# Altium PCB cm4gateway.PcbDoc (part 2 of 5)
Units mil, origin at the board's own origin, x right, y up, seen from the top; angles counter-clockwise.
Board outline 6299.21 x 4960.63 mil, 8 copper layers (Signal 1, Ground Plane 1, Signal 2, Power Plane 1, Power Plane 2, Signal 3, Ground Plane 2, Signal 4), stack 60.024 mil thick; 403 components, 273 nets, 1526 pads, 1156 vias.
Unrouted connection lines stored in the file: 5.
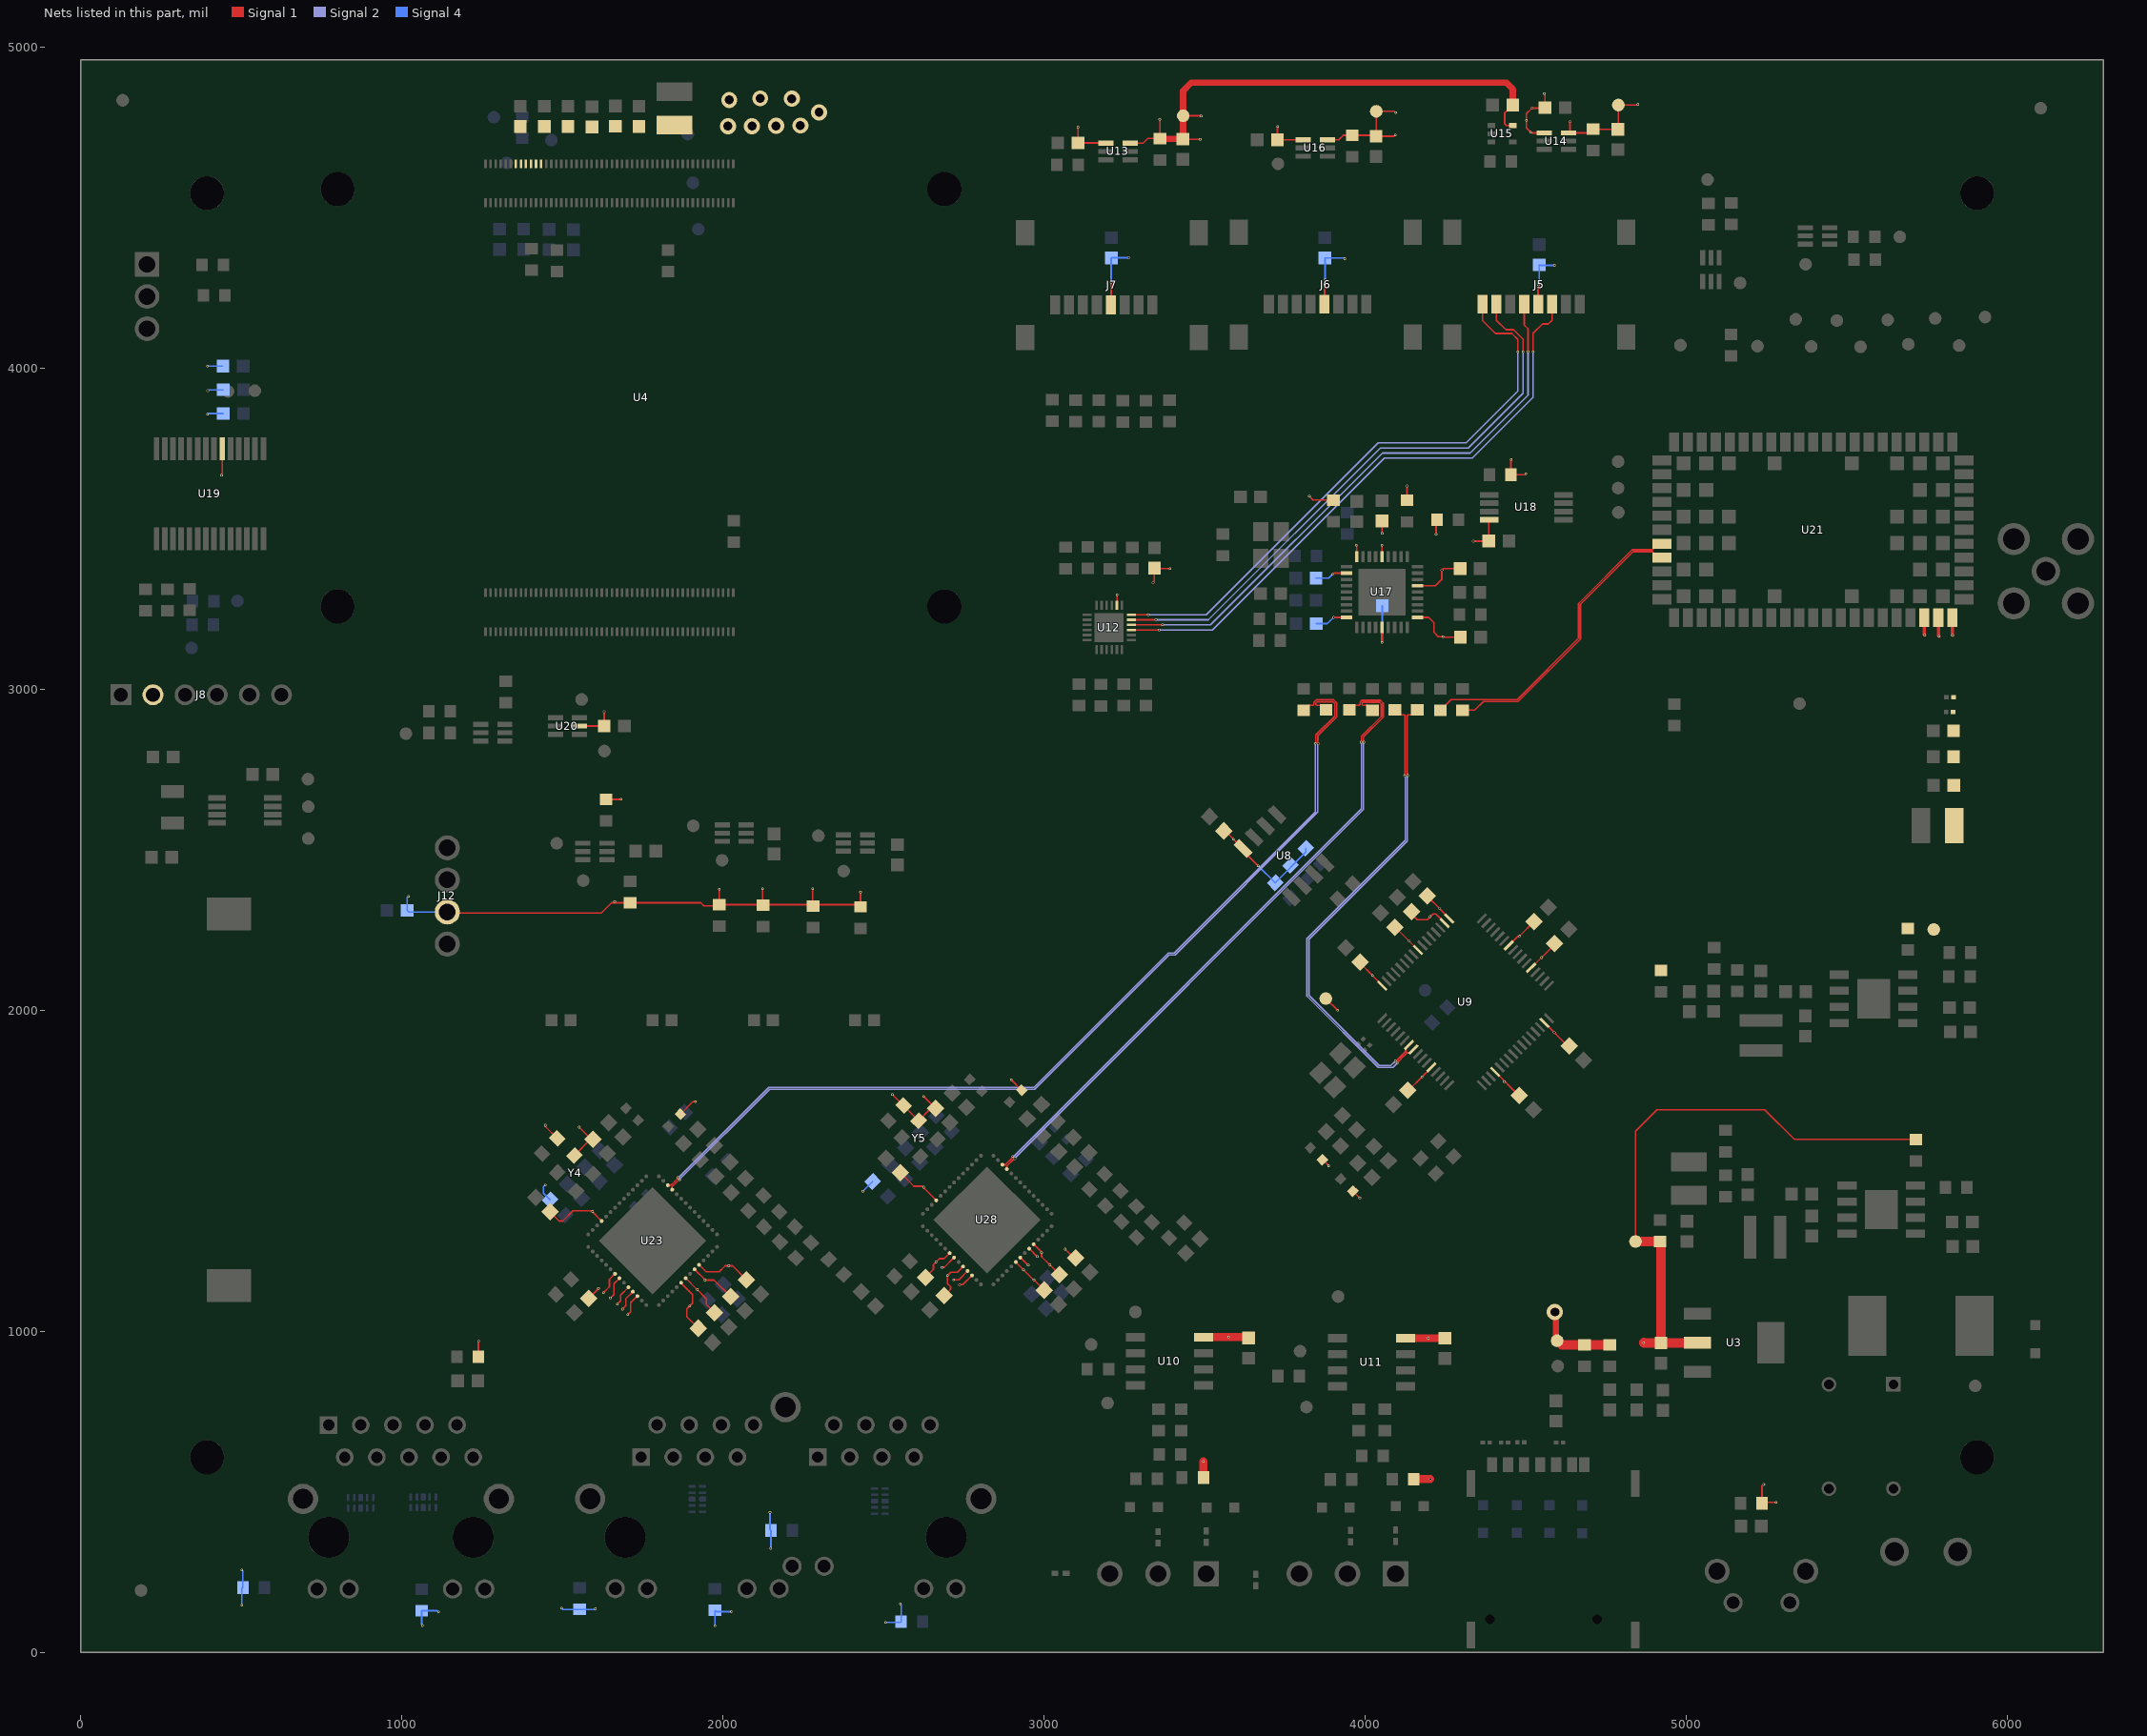
[diagram p8: the nets of this part, all layers, seen from the top]

## Footprints (in the part's own frame and the unit in brackets; to place one, negate y for a bottom-side part, rotate by r counter-clockwise, add the part's x,y. Pads: shape width x height; smd on the part's side, far side on the other; paste and mask are expansions set on the pad) (continued)
QFN50P800X800X100-57N-D [mm]
  round 0.3 smd: 1(-3.95,3.25) 2(-3.95,2.75) 3(-3.95,2.25) 4(-3.95,1.75) 5(-3.95,1.25) 6(-3.95,0.75) 7(-3.95,0.25) 8(-3.95,-0.25) 9(-3.95,-0.75) 10(-3.95,-1.25) 11(-3.95,-1.75) 12(-3.95,-2.25) 13(-3.95,-2.75) 14(-3.95,-3.25) 15(-3.25,-3.95) 16(-2.75,-3.95) 17(-2.25,-3.95) 18(-1.75,-3.95) 19(-1.25,-3.95) 20(-0.75,-3.95) 21(-0.25,-3.95) 22(0.25,-3.95) 23(0.75,-3.95) 24(1.25,-3.95) 25(1.75,-3.95) 26(2.25,-3.95) 27(2.75,-3.95) 28(3.25,-3.95) 29(3.95,-3.25) 30(3.95,-2.75) 31(3.95,-2.25) 32(3.95,-1.75) 33(3.95,-1.25) 34(3.95,-0.75) 35(3.95,-0.25) 36(3.95,0.25) 37(3.95,0.75) 38(3.95,1.25) 39(3.95,1.75) 40(3.95,2.25) 41(3.95,2.75) 42(3.95,3.25) 43(3.25,3.95) 44(2.75,3.95) 45(2.25,3.95) 46(1.75,3.95) 47(1.25,3.95) 48(0.75,3.95) 49(0.25,3.95) 50(-0.25,3.95) 51(-0.75,3.95) 52(-1.25,3.95) 53(-1.75,3.95) 54(-2.25,3.95) 55(-2.75,3.95) 56(-3.25,3.95)
  rrect0% 6x6 smd: 57(0,0)
  Signal 1 region: 4.4,0.1 3.65,0.099 3.611,0.104 3.574,0.119 3.543,0.143 3.519,0.174 3.504,0.211 3.499,0.25 3.504,0.289 3.519,0.326 3.543,0.357 3.574,0.381 3.611,0.396 3.65,0.401 3.65,0.4 4.4,0.4 4.4,0.1
  Signal 1 region: 4.4,-0.4 3.65,-0.401 3.611,-0.396 3.574,-0.381 3.543,-0.357 3.519,-0.326 3.504,-0.289 3.499,-0.25 3.504,-0.211 3.519,-0.174 3.543,-0.143 3.574,-0.119 3.611,-0.104 3.65,-0.099 3.65,-0.1 4.4,-0.1 4.4,-0.4
  Signal 1 region: 4.4,-2.9 3.65,-2.901 3.611,-2.896 3.574,-2.881 3.543,-2.857 3.519,-2.826 3.504,-2.789 3.499,-2.75 3.504,-2.711 3.519,-2.674 3.543,-2.643 3.574,-2.619 3.611,-2.604 3.65,-2.599 3.65,-2.6 4.4,-2.6 4.4,-2.9
  Signal 1 region: 4.4,-3.4 3.65,-3.401 3.611,-3.396 3.574,-3.381 3.543,-3.357 3.519,-3.326 3.504,-3.289 3.499,-3.25 3.504,-3.211 3.519,-3.174 3.543,-3.143 3.574,-3.119 3.611,-3.104 3.65,-3.099 3.65,-3.1 4.4,-3.1 4.4,-3.4
  Signal 1 region: 4.4,2.1 3.65,2.099 3.611,2.104 3.574,2.119 3.543,2.143 3.519,2.174 3.504,2.211 3.499,2.25 3.504,2.289 3.519,2.326 3.543,2.357 3.574,2.381 3.611,2.396 3.65,2.401 3.65,2.4 4.4,2.4 4.4,2.1
  Signal 1 region: 4.4,1.6 3.65,1.599 3.611,1.604 3.574,1.619 3.543,1.643 3.519,1.674 3.504,1.711 3.499,1.75 3.504,1.789 3.519,1.826 3.543,1.857 3.574,1.881 3.611,1.896 3.65,1.901 3.65,1.9 4.4,1.9 4.4,1.6
  Signal 1 region: 4.4,3.1 3.65,3.099 3.611,3.104 3.574,3.119 3.543,3.143 3.519,3.174 3.504,3.211 3.499,3.25 3.504,3.289 3.519,3.326 3.543,3.357 3.574,3.381 3.611,3.396 3.65,3.401 3.65,3.4 4.4,3.4 4.4,3.1
  Signal 1 region: 4.4,2.6 3.65,2.599 3.611,2.604 3.574,2.619 3.543,2.643 3.519,2.674 3.504,2.711 3.499,2.75 3.504,2.789 3.519,2.826 3.543,2.857 3.574,2.881 3.611,2.896 3.65,2.901 3.65,2.9 4.4,2.9 4.4,2.6
  Signal 1 region: 4.4,1.1 3.65,1.099 3.611,1.104 3.574,1.119 3.543,1.143 3.519,1.174 3.504,1.211 3.499,1.25 3.504,1.289 3.519,1.326 3.543,1.357 3.574,1.381 3.611,1.396 3.65,1.401 3.65,1.4 4.4,1.4 4.4,1.1
  Signal 1 region: 4.4,0.6 3.65,0.599 3.611,0.604 3.574,0.619 3.543,0.643 3.519,0.674 3.504,0.711 3.499,0.75 3.504,0.789 3.519,0.826 3.543,0.857 3.574,0.881 3.611,0.896 3.65,0.901 3.65,0.9 4.4,0.9 4.4,0.6
  Signal 1 region: 3.1,-4.4 3.099,-3.65 3.104,-3.611 3.119,-3.574 3.143,-3.543 3.174,-3.519 3.211,-3.504 3.25,-3.499 3.289,-3.504 3.326,-3.519 3.357,-3.543 3.381,-3.574 3.396,-3.611 3.401,-3.65 3.4,-3.65 3.4,-4.4 3.1,-4.4
  Signal 1 region: 2.6,-4.4 2.599,-3.65 2.604,-3.611 2.619,-3.574 2.643,-3.543 2.674,-3.519 2.711,-3.504 2.75,-3.499 2.789,-3.504 2.826,-3.519 2.857,-3.543 2.881,-3.574 2.896,-3.611 2.901,-3.65 2.9,-3.65 2.9,-4.4 2.6,-4.4
  Signal 1 region: 2.1,-4.4 2.099,-3.65 2.104,-3.611 2.119,-3.574 2.143,-3.543 2.174,-3.519 2.211,-3.504 2.25,-3.499 2.289,-3.504 2.326,-3.519 2.357,-3.543 2.381,-3.574 2.396,-3.611 2.401,-3.65 2.4,-3.65 2.4,-4.4 2.1,-4.4
  Signal 1 region: 1.6,-4.4 1.599,-3.65 1.604,-3.611 1.619,-3.574 1.643,-3.543 1.674,-3.519 1.711,-3.504 1.75,-3.499 1.789,-3.504 1.826,-3.519 1.857,-3.543 1.881,-3.574 1.896,-3.611 1.901,-3.65 1.9,-3.65 1.9,-4.4 1.6,-4.4
  Signal 1 region: 1.1,-4.4 1.099,-3.65 1.104,-3.611 1.119,-3.574 1.143,-3.543 1.174,-3.519 1.211,-3.504 1.25,-3.499 1.289,-3.504 1.326,-3.519 1.357,-3.543 1.381,-3.574 1.396,-3.611 1.401,-3.65 1.4,-3.65 1.4,-4.4 1.1,-4.4
  Signal 1 region: 0.6,-4.4 0.599,-3.65 0.604,-3.611 0.619,-3.574 0.643,-3.543 0.674,-3.519 0.711,-3.504 0.75,-3.499 0.789,-3.504 0.826,-3.519 0.857,-3.543 0.881,-3.574 0.896,-3.611 0.901,-3.65 0.9,-3.65 0.9,-4.4 0.6,-4.4
  Signal 1 region: 0.1,-4.4 0.099,-3.65 0.104,-3.611 0.119,-3.574 0.143,-3.543 0.174,-3.519 0.211,-3.504 0.25,-3.499 0.289,-3.504 0.326,-3.519 0.357,-3.543 0.381,-3.574 0.396,-3.611 0.401,-3.65 0.4,-3.65 0.4,-4.4 0.1,-4.4
  Signal 1 region: -0.4,-4.4 -0.401,-3.65 -0.396,-3.611 -0.381,-3.574 -0.357,-3.543 -0.326,-3.519 -0.289,-3.504 -0.25,-3.499 -0.211,-3.504 -0.174,-3.519 -0.143,-3.543 -0.119,-3.574 -0.104,-3.611 -0.099,-3.65 -0.1,-3.65 -0.1,-4.4 -0.4,-4.4
  Signal 1 region: -0.9,-4.4 -0.901,-3.65 -0.896,-3.611 -0.881,-3.574 -0.857,-3.543 -0.826,-3.519 -0.789,-3.504 -0.75,-3.499 -0.711,-3.504 -0.674,-3.519 -0.643,-3.543 -0.619,-3.574 -0.604,-3.611 -0.599,-3.65 -0.6,-3.65 -0.6,-4.4 -0.9,-4.4
  Signal 1 region: -1.4,-4.4 -1.401,-3.65 -1.396,-3.611 -1.381,-3.574 -1.357,-3.543 -1.326,-3.519 -1.289,-3.504 -1.25,-3.499 -1.211,-3.504 -1.174,-3.519 -1.143,-3.543 -1.119,-3.574 -1.104,-3.611 -1.099,-3.65 -1.1,-3.65 -1.1,-4.4 -1.4,-4.4
  Signal 1 region: -1.9,-4.4 -1.901,-3.65 -1.896,-3.611 -1.881,-3.574 -1.857,-3.543 -1.826,-3.519 -1.789,-3.504 -1.75,-3.499 -1.711,-3.504 -1.674,-3.519 -1.643,-3.543 -1.619,-3.574 -1.604,-3.611 -1.599,-3.65 -1.6,-3.65 -1.6,-4.4 -1.9,-4.4
  Signal 1 region: -2.4,-4.4 -2.401,-3.65 -2.396,-3.611 -2.381,-3.574 -2.357,-3.543 -2.326,-3.519 -2.289,-3.504 -2.25,-3.499 -2.211,-3.504 -2.174,-3.519 -2.143,-3.543 -2.119,-3.574 -2.104,-3.611 -2.099,-3.65 -2.1,-3.65 -2.1,-4.4 -2.4,-4.4
  Signal 1 region: -2.9,-4.4 -2.901,-3.65 -2.896,-3.611 -2.881,-3.574 -2.857,-3.543 -2.826,-3.519 -2.789,-3.504 -2.75,-3.499 -2.711,-3.504 -2.674,-3.519 -2.643,-3.543 -2.619,-3.574 -2.604,-3.611 -2.599,-3.65 -2.6,-3.65 -2.6,-4.4 -2.9,-4.4
  Signal 1 region: -3.4,-4.4 -3.401,-3.65 -3.396,-3.611 -3.381,-3.574 -3.357,-3.543 -3.326,-3.519 -3.289,-3.504 -3.25,-3.499 -3.211,-3.504 -3.174,-3.519 -3.143,-3.543 -3.119,-3.574 -3.104,-3.611 -3.099,-3.65 -3.1,-3.65 -3.1,-4.4 -3.4,-4.4
  Signal 1 region: 3.4,4.4 3.401,3.65 3.396,3.611 3.381,3.574 3.357,3.543 3.326,3.519 3.289,3.504 3.25,3.499 3.211,3.504 3.174,3.519 3.143,3.543 3.119,3.574 3.104,3.611 3.099,3.65 3.1,3.65 3.1,4.4 3.4,4.4
  Signal 1 region: 2.9,4.4 2.901,3.65 2.896,3.611 2.881,3.574 2.857,3.543 2.826,3.519 2.789,3.504 2.75,3.499 2.711,3.504 2.674,3.519 2.643,3.543 2.619,3.574 2.604,3.611 2.599,3.65 2.6,3.65 2.6,4.4 2.9,4.4
  Signal 1 region: 2.4,4.4 2.401,3.65 2.396,3.611 2.381,3.574 2.357,3.543 2.326,3.519 2.289,3.504 2.25,3.499 2.211,3.504 2.174,3.519 2.143,3.543 2.119,3.574 2.104,3.611 2.099,3.65 2.1,3.65 2.1,4.4 2.4,4.4
  Signal 1 region: 1.9,4.4 1.901,3.65 1.896,3.611 1.881,3.574 1.857,3.543 1.826,3.519 1.789,3.504 1.75,3.499 1.711,3.504 1.674,3.519 1.643,3.543 1.619,3.574 1.604,3.611 1.599,3.65 1.6,3.65 1.6,4.4 1.9,4.4
  Signal 1 region: 1.4,4.4 1.401,3.65 1.396,3.611 1.381,3.574 1.357,3.543 1.326,3.519 1.289,3.504 1.25,3.499 1.211,3.504 1.174,3.519 1.143,3.543 1.119,3.574 1.104,3.611 1.099,3.65 1.1,3.65 1.1,4.4 1.4,4.4
  Signal 1 region: 0.9,4.4 0.901,3.65 0.896,3.611 0.881,3.574 0.857,3.543 0.826,3.519 0.789,3.504 0.75,3.499 0.711,3.504 0.674,3.519 0.643,3.543 0.619,3.574 0.604,3.611 0.599,3.65 0.6,3.65 0.6,4.4 0.9,4.4
  Signal 1 region: 0.4,4.4 0.401,3.65 0.396,3.611 0.381,3.574 0.357,3.543 0.326,3.519 0.289,3.504 0.25,3.499 0.211,3.504 0.174,3.519 0.143,3.543 0.119,3.574 0.104,3.611 0.099,3.65 0.1,3.65 0.1,4.4 0.4,4.4
  Signal 1 region: -0.1,4.4 -0.099,3.65 -0.104,3.611 -0.119,3.574 -0.143,3.543 -0.174,3.519 -0.211,3.504 -0.25,3.499 -0.289,3.504 -0.326,3.519 -0.357,3.543 -0.381,3.574 -0.396,3.611 -0.401,3.65 -0.4,3.65 -0.4,4.4 -0.1,4.4
  Signal 1 region: -0.6,4.4 -0.599,3.65 -0.604,3.611 -0.619,3.574 -0.643,3.543 -0.674,3.519 -0.711,3.504 -0.75,3.499 -0.789,3.504 -0.826,3.519 -0.857,3.543 -0.881,3.574 -0.896,3.611 -0.901,3.65 -0.9,3.65 -0.9,4.4 -0.6,4.4
  Signal 1 region: -1.1,4.4 -1.099,3.65 -1.104,3.611 -1.119,3.574 -1.143,3.543 -1.174,3.519 -1.211,3.504 -1.25,3.499 -1.289,3.504 -1.326,3.519 -1.357,3.543 -1.381,3.574 -1.396,3.611 -1.401,3.65 -1.4,3.65 -1.4,4.4 -1.1,4.4
  Signal 1 region: -1.6,4.4 -1.599,3.65 -1.604,3.611 -1.619,3.574 -1.643,3.543 -1.674,3.519 -1.711,3.504 -1.75,3.499 -1.789,3.504 -1.826,3.519 -1.857,3.543 -1.881,3.574 -1.896,3.611 -1.901,3.65 -1.9,3.65 -1.9,4.4 -1.6,4.4
  Signal 1 region: -2.1,4.4 -2.099,3.65 -2.104,3.611 -2.119,3.574 -2.143,3.543 -2.174,3.519 -2.211,3.504 -2.25,3.499 -2.289,3.504 -2.326,3.519 -2.357,3.543 -2.381,3.574 -2.396,3.611 -2.401,3.65 -2.4,3.65 -2.4,4.4 -2.1,4.4
  Signal 1 region: -2.6,4.4 -2.599,3.65 -2.604,3.611 -2.619,3.574 -2.643,3.543 -2.674,3.519 -2.711,3.504 -2.75,3.499 -2.789,3.504 -2.826,3.519 -2.857,3.543 -2.881,3.574 -2.896,3.611 -2.901,3.65 -2.9,3.65 -2.9,4.4 -2.6,4.4
  Signal 1 region: -3.1,4.4 -3.099,3.65 -3.104,3.611 -3.119,3.574 -3.143,3.543 -3.174,3.519 -3.211,3.504 -3.25,3.499 -3.289,3.504 -3.326,3.519 -3.357,3.543 -3.381,3.574 -3.396,3.611 -3.401,3.65 -3.4,3.65 -3.4,4.4 -3.1,4.4
  Signal 1 region: -4.4,-0.6 -3.65,-0.599 -3.611,-0.604 -3.574,-0.619 -3.543,-0.643 -3.519,-0.674 -3.504,-0.711 -3.499,-0.75 -3.504,-0.789 -3.519,-0.826 -3.543,-0.857 -3.574,-0.881 -3.611,-0.896 -3.65,-0.901 -3.65,-0.9 -4.4,-0.9 -4.4,-0.6
  Signal 1 region: -4.4,-1.1 -3.65,-1.099 -3.611,-1.104 -3.574,-1.119 -3.543,-1.143 -3.519,-1.174 -3.504,-1.211 -3.499,-1.25 -3.504,-1.289 -3.519,-1.326 -3.543,-1.357 -3.574,-1.381 -3.611,-1.396 -3.65,-1.401 -3.65,-1.4 -4.4,-1.4 -4.4,-1.1
  Signal 1 region: -4.4,-0.1 -3.65,-0.099 -3.611,-0.104 -3.574,-0.119 -3.543,-0.143 -3.519,-0.174 -3.504,-0.211 -3.499,-0.25 -3.504,-0.289 -3.519,-0.326 -3.543,-0.357 -3.574,-0.381 -3.611,-0.396 -3.65,-0.401 -3.65,-0.4 -4.4,-0.4 -4.4,-0.1
  Signal 1 region: -4.4,-2.6 -3.65,-2.599 -3.611,-2.604 -3.574,-2.619 -3.543,-2.643 -3.519,-2.674 -3.504,-2.711 -3.499,-2.75 -3.504,-2.789 -3.519,-2.826 -3.543,-2.857 -3.574,-2.881 -3.611,-2.896 -3.65,-2.901 -3.65,-2.9 -4.4,-2.9 -4.4,-2.6
  Signal 1 region: -4.4,-3.1 -3.65,-3.099 -3.611,-3.104 -3.574,-3.119 -3.543,-3.143 -3.519,-3.174 -3.504,-3.211 -3.499,-3.25 -3.504,-3.289 -3.519,-3.326 -3.543,-3.357 -3.574,-3.381 -3.611,-3.396 -3.65,-3.401 -3.65,-3.4 -4.4,-3.4 -4.4,-3.1
  Signal 1 region: -4.4,-1.6 -3.65,-1.599 -3.611,-1.604 -3.574,-1.619 -3.543,-1.643 -3.519,-1.674 -3.504,-1.711 -3.499,-1.75 -3.504,-1.789 -3.519,-1.826 -3.543,-1.857 -3.574,-1.881 -3.611,-1.896 -3.65,-1.901 -3.65,-1.9 -4.4,-1.9 -4.4,-1.6
  Signal 1 region: -4.4,-2.1 -3.65,-2.099 -3.611,-2.104 -3.574,-2.119 -3.543,-2.143 -3.519,-2.174 -3.504,-2.211 -3.499,-2.25 -3.504,-2.289 -3.519,-2.326 -3.543,-2.357 -3.574,-2.381 -3.611,-2.396 -3.65,-2.401 -3.65,-2.4 -4.4,-2.4 -4.4,-2.1
  Signal 1 region: -4.4,2.4 -3.65,2.401 -3.611,2.396 -3.574,2.381 -3.543,2.357 -3.519,2.326 -3.504,2.289 -3.499,2.25 -3.504,2.211 -3.519,2.174 -3.543,2.143 -3.574,2.119 -3.611,2.104 -3.65,2.099 -3.65,2.1 -4.4,2.1 -4.4,2.4
  Signal 1 region: -4.4,2.9 -3.65,2.901 -3.611,2.896 -3.574,2.881 -3.543,2.857 -3.519,2.826 -3.504,2.789 -3.499,2.75 -3.504,2.711 -3.519,2.674 -3.543,2.643 -3.574,2.619 -3.611,2.604 -3.65,2.599 -3.65,2.6 -4.4,2.6 -4.4,2.9
  Signal 1 region: -4.4,3.4 -3.65,3.401 -3.611,3.396 -3.574,3.381 -3.543,3.357 -3.519,3.326 -3.504,3.289 -3.499,3.25 -3.504,3.211 -3.519,3.174 -3.543,3.143 -3.574,3.119 -3.611,3.104 -3.65,3.099 -3.65,3.1 -4.4,3.1 -4.4,3.4
  Signal 1 region: -4.4,0.4 -3.65,0.401 -3.611,0.396 -3.574,0.381 -3.543,0.357 -3.519,0.326 -3.504,0.289 -3.499,0.25 -3.504,0.211 -3.519,0.174 -3.543,0.143 -3.574,0.119 -3.611,0.104 -3.65,0.099 -3.65,0.1 -4.4,0.1 -4.4,0.4
  Signal 1 region: -4.4,0.9 -3.65,0.901 -3.611,0.896 -3.574,0.881 -3.543,0.857 -3.519,0.826 -3.504,0.789 -3.499,0.75 -3.504,0.711 -3.519,0.674 -3.543,0.643 -3.574,0.619 -3.611,0.604 -3.65,0.599 -3.65,0.6 -4.4,0.6 -4.4,0.9
  Signal 1 region: -4.4,1.4 -3.65,1.401 -3.611,1.396 -3.574,1.381 -3.543,1.357 -3.519,1.326 -3.504,1.289 -3.499,1.25 -3.504,1.211 -3.519,1.174 -3.543,1.143 -3.574,1.119 -3.611,1.104 -3.65,1.099 -3.65,1.1 -4.4,1.1 -4.4,1.4
  Signal 1 region: -4.4,1.9 -3.65,1.901 -3.611,1.896 -3.574,1.881 -3.543,1.857 -3.519,1.826 -3.504,1.789 -3.499,1.75 -3.504,1.711 -3.519,1.674 -3.543,1.643 -3.574,1.619 -3.611,1.604 -3.65,1.599 -3.65,1.6 -4.4,1.6 -4.4,1.9
  Signal 1 region: 4.4,-2.4 3.65,-2.401 3.611,-2.396 3.574,-2.381 3.543,-2.357 3.519,-2.326 3.504,-2.289 3.499,-2.25 3.504,-2.211 3.519,-2.174 3.543,-2.143 3.574,-2.119 3.611,-2.104 3.65,-2.099 3.65,-2.1 4.4,-2.1 4.4,-2.4
  Signal 1 region: 4.4,-1.9 3.65,-1.901 3.611,-1.896 3.574,-1.881 3.543,-1.857 3.519,-1.826 3.504,-1.789 3.499,-1.75 3.504,-1.711 3.519,-1.674 3.543,-1.643 3.574,-1.619 3.611,-1.604 3.65,-1.599 3.65,-1.6 4.4,-1.6 4.4,-1.9
  Signal 1 region: 4.4,-0.9 3.65,-0.901 3.611,-0.896 3.574,-0.881 3.543,-0.857 3.519,-0.826 3.504,-0.789 3.499,-0.75 3.504,-0.711 3.519,-0.674 3.543,-0.643 3.574,-0.619 3.611,-0.604 3.65,-0.599 3.65,-0.6 4.4,-0.6 4.4,-0.9
  Signal 1 region: 4.4,-1.4 3.65,-1.401 3.611,-1.396 3.574,-1.381 3.543,-1.357 3.519,-1.326 3.504,-1.289 3.499,-1.25 3.504,-1.211 3.519,-1.174 3.543,-1.143 3.574,-1.119 3.611,-1.104 3.65,-1.099 3.65,-1.1 4.4,-1.1 4.4,-1.4
  silkscreen extent -4.52,3.88 -4.28,4.12, body extent -4.05,-4.05 4.05,4.05, height 1
RESC1608N [mm] "Chip Resistor, Body 1.6x0.8mm, IPC Medium Density"
  rect 0.9x1 smd: 1(-0.85,0) 2(0.85,0)
  body extent -0.99,-0.45 0.99,0.53, height 0.43
SC70-TPS22919DCKR6 [mm]
  rect 1.2x0.4 smd: 1(-0.95,0.65) 2(-0.95,0) 3(-0.95,-0.65) 4(0.95,-0.65) 5(0.95,0) 6(0.95,0.65)
  silkscreen extent -1.55,1.2 -0.35,1.2, body extent -1.02,-1 1.08,1, height 1.1
SMTU2032GTR [mm]
  rect 2.6x3.5 smd: 1(-14.7,0) 2(14.7,0)
  silkscreen extent -16.6,-10 16,10, body extent -15.9,-10.4 16.1,9.6, height 5.55
SOIC127P600X170-9N [mm]
  rect 1.525x0.65 smd: 1(-2.712,1.905) 2(-2.712,0.635) 3(-2.712,-0.635) 4(-2.712,-1.905) 5(2.712,-1.905) 6(2.712,-0.635) 7(2.712,0.635) 8(2.712,1.905)
  rect 2.6x3.1 smd: 9(0,0)
  silkscreen extent -3.47,2.58 -1.95,2.58, body extent -3.01,-2.45 3.01,2.45, height 1.57
SOIC127P600X175-8N-2 [mm]
  rect 1.5x0.65 smd: 1(-2.7,1.905) 2(-2.7,0.635) 3(-2.7,-0.635) 4(-2.7,-1.905) 5(2.7,-1.905) 6(2.7,-0.635) 7(2.7,0.635) 8(2.7,1.905)
  silkscreen extent -3.45,-2.45 1.6,2.58, body extent -2.91,-2.55 3.11,2.35, height 1.63
SOP65P490X110-8N [mm]
  rect 1.4x0.45 smd: 1(-2.2,0.975) 2(-2.2,0.325) 3(-2.2,-0.325) 4(-2.2,-0.975) 5(2.2,-0.975) 6(2.2,-0.325) 7(2.2,0.325) 8(2.2,0.975)
  silkscreen extent -2.9,-1.5 1.15,1.55, body extent -2.45,-1.5 2.45,1.5, height 1.1
SOP65P780X200-28N [mm]
  rect 1.8x0.45 smd: 1(-3.55,4.225) 2(-3.55,3.575) 3(-3.55,2.925) 4(-3.55,2.275) 5(-3.55,1.625) 6(-3.55,0.975) 7(-3.55,0.325) 8(-3.55,-0.325) 9(-3.55,-0.975) 10(-3.55,-1.625) 11(-3.55,-2.275) 12(-3.55,-2.925) 13(-3.55,-3.575) 14(-3.55,-4.225) 15(3.55,-4.225) 16(3.55,-3.575) 17(3.55,-2.925) 18(3.55,-2.275) 19(3.55,-1.625) 20(3.55,-0.975) 21(3.55,-0.325) 22(3.55,0.325) 23(3.55,0.975) 24(3.55,1.625) 25(3.55,2.275) 26(3.55,2.925) 27(3.55,3.575) 28(3.55,4.225)
  silkscreen extent -4.4,-5.1 2.3,5.1, body extent -3.9,-5.1 3.9,5.1, height 2
SOT65P210X110-6N [mm]
  rect 1.2x0.4 smd: 1(-0.95,0.65) 2(-0.95,0) 3(-0.95,-0.65) 4(0.95,-0.65) 5(0.95,0) 6(0.95,0.65)
  silkscreen extent -1.55,1.2 -0.35,1.2, body extent -0.9,-1.07 1.2,1.07, height 0.98
SOT65P210X1106N [mm]
  rect 1.2x0.4 smd: 1(-0.95,0.65) 2(-0.95,0) 3(-0.95,-0.65) 4(0.95,-0.65) 5(0.95,0) 6(0.95,0.65)
  silkscreen extent -1.55,1.2 -0.35,1.2, body extent -1.05,-1 1.05,1, height 1
SOT-223-4-2 [mm]
  rect 2.15x0.95 smd paste+0 mask+0.07: 1(-2.9,2.3) 2(-2.9,0) 3(-2.9,-2.3)
  rect 2.15x3.3 smd paste+0 mask+0.07: 4(2.9,0)
  silkscreen extent -1.4,-3.35 1.4,3.35, body extent -3.5,-3.25 3.5,3.25, height 1.8
SOT-353 [mm] "SOT23, 6-Leads, Body 2,90x2,80mm, Pitch 0,95mm, IPC Medium Density"
  rect 0.6x0.4 smd mask+0.07: 1(0,0) 2(0,-0.65) 3(0,-1.3) 4(1.7,-1.3) 5(1.7,0)
  silkscreen extent 0.56,-1.71 1.15,0.43, body extent -0.2,-1.71 1.9,0.44, height 1.02
SQFN-36 [mm]
  rect 0.9x0.28 smd: 1(-2.8,2) 2(-2.8,1.5) 3(-2.8,1) 4(-2.8,0.5) 5(-2.8,0) 6(-2.8,-0.5) 7(-2.8,-1) 8(-2.8,-1.5) 9(-2.8,-2) 19(2.8,-2) 20(2.8,-1.5) 21(2.8,-1) 22(2.8,-0.5) 23(2.8,0) 24(2.8,0.5) 25(2.8,1) 26(2.8,1.5) 27(2.8,2)
  rect 0.28x0.9 smd: 10(-2,-2.8) 11(-1.5,-2.8) 12(-1,-2.8) 13(-0.5,-2.8) 14(0,-2.8) 15(0.5,-2.8) 16(1,-2.8) 17(1.5,-2.8) 18(2,-2.8) 28(2,2.8) 29(1.5,2.8) 30(1,2.8) 31(0.5,2.8) 32(0,2.8) 33(-0.5,2.8) 34(-1,2.8) 35(-1.5,2.8) 36(-2,2.8)
  rrect0% 3.7x3.7 smd: 37(0,0)
  silkscreen extent -3.03,-3 3.01,3, body extent -3.05,-3.05 3.05,3.05, height 1
TP [mm]
  round 1 smd paste-2 mask+0.1: 1(0,0)
  silkscreen extent -0.75,-0.75 0.75,0.75
TQFN-24 [mm]
  rect 0.7x0.2 smd mask+0.07: 1(-1.753,1) 2(-1.753,0.6) 3(-1.753,0.2) 4(-1.753,-0.2) 5(-1.753,-0.6) 6(-1.753,-1) 13(1.753,-1) 14(1.753,-0.6) 15(1.753,-0.2) 16(1.753,0.2) 17(1.753,0.6) 18(1.753,1)
  rect 0.2x0.7 smd mask+0.07: 7(-1,-1.753) 8(-0.6,-1.753) 9(-0.2,-1.753) 10(0.2,-1.753) 11(0.6,-1.753) 12(1,-1.753) 19(1,1.753) 20(0.6,1.753) 21(0.2,1.753) 22(-0.2,1.753) 23(-0.6,1.753) 24(-1,1.753)
  rect 2.3x2.3 smd mask+0.07: 25(0,0)
  silkscreen extent -2.06,-2.05 2.1,2.1, body extent -1.5,-1.5 1.5,1.5, height 0.98
TSSOP-8AT24C04D-XHM-B [mm]
  rect 1.475x0.45 smd: 1(-2.938,0.975) 2(-2.938,0.325) 3(-2.938,-0.325) 4(-2.938,-0.975) 5(2.938,-0.975) 6(2.938,-0.325) 7(2.938,0.325) 8(2.938,0.975)
  silkscreen extent -3.67,-1.5 1.85,1.55, body extent -3.4,-1.5 3,1.5, height 1.2
USON-10 [mm]
  rrect50% 0.565x0.2 smd mask+0.07: 1(0,0) 2(0,-0.5) 4(0,-1.5) 5(0,-2) 6(0.835,-2) 7(0.835,-1.5) 9(0.835,-0.5) 10(0.835,0)
  rrect50% 0.565x0.4 smd mask+0.07: 3(0,-1) 8(0.835,-1)
  silkscreen extent -0.53,-2.5 1.29,0.5, body extent -0.08,-2.26 0.93,0.24, height 0.54
WE-RJ45-7499021125 [mm]
  rect 1.4x1.4 hole 0.89: A1(-11.43,6.5) B1(2.54,6.5)
  round 1.4 hole 0.89: A2(-10.16,9.04) A3(-8.89,6.5) A4(-7.62,9.04) A5(-6.35,6.5) A6(-5.08,9.04) A7(-3.81,6.5) A8(-2.54,9.04) B2(3.81,9.04) B3(5.08,6.5) B4(6.35,9.04) B5(7.62,6.5) B6(8.89,9.04) B7(10.16,6.5) B8(11.43,9.04)
  round 1.52 hole 1.02: A9(-13.47,-3.91) A10(-10.93,-3.91) A11(-3.05,-3.91) A12(-0.51,-3.91) B9(0.51,-2.14) B10(3.05,-2.14) B11(10.93,-3.91) B12(13.47,-3.91)
  round 3.25 hole 3.25 unplated: MH1(-12.7,0.15) MH2(12.7,0.15)
  round 2.4 hole 1.63: Shell(-15.465,3.2) Shell(0,10.44) Shell(15.465,3.2)
  silkscreen extent -16.86,-10.75 16.86,10.75, body extent -16.92,-10.75 16.92,10.75, height 14.81
WE-RJ45-7499111121A [mm]
  rect 1.4x1.4 hole 0.9: 1(-5.715,6.485)
  round 1.4 hole 0.9: 2(-4.445,3.945) 3(-3.175,6.485) 4(-1.905,3.945) 5(-0.635,6.485) 6(0.635,3.945) 7(1.905,6.485) 8(3.175,3.945) 9(4.445,6.485) 10(5.715,3.945)
  round 1.52 hole 1.02: 11(-6.63,-6.485) 12(-4.09,-6.485) 13(4.09,-6.485) 14(6.63,-6.485)
  round 3.25 hole 3.25 unplated: MH1(-5.715,-2.405) MH2(5.715,-2.405)
  round 2.4 hole 1.6: Shell(-7.745,0.645) Shell(7.745,0.645)
  silkscreen extent -9.83,-13.29 9.83,8.55, body extent -9.92,-13.29 9.92,8.55, height 16.01
XT1312HHRXX32K76E [mm]
  rect 1x1.8 smd: 1(-1.25,0) 2(1.25,0)
  body extent -1.6,-0.75 1.6,0.75, height 0.81

## Part data
C1 C4 C8 C11 C15 C17 C19 C20 C21 C23 C25 C31 C33 C36 C37 C38 C40 C43 C44 C45 C46 C47 C48 C49 C50 C51 C54 C55 C57 C58 C59 C60 C61 C62 C63 C64 C65 C66 C67 C68 C71 C72 C73 C80 C85 C92 C95 C96 C97 C98 C102 C107 C108 C109 C114 C116 C117 C118 C122 C127 C128 C129: library part CAP-000000017, Value 1="100 nF", Value 2=50V, DES="Ceramic Capacitor, 100 nF, 50V, X7R, 0603", FTP=603, MAN=Murata, MANREF=GRM188R71H104KA93D, Part Number=CAP-000000017, SUPREF=81-GRM188R71H104KA93D
C2 C9: library part CAP-000000027, Value 1="22 pF", Value 2=50V, DES="Ceramic Capacitor, 22 pF, 50V, C0G, 0603", FTP=603, MAN=Murata, MANREF=GRM1885C1H220JA01D, Part Number=CAP-000000027, SUPREF=81-GRM1885C1H220JA01D
C3: library part CAP-000000024, Value 1="22 µF", Value 2=25V, DES="Ceramic Capacitor, 22 µF, 25V, X5R, 0603", FTP=603, MAN=Murata, MANREF=GRM188R61E226ME15D, Part Number=CAP-000000024, SUPREF=81-GRM188R61E226ME15D
C5 C12 C27 C28 C29 C30 C52 C53 C56: library part CAP-000000025, Value 1="10 µF", Value 2=50V, DES="Ceramic Capacitor, 10 µF, 50V, X5R, 0603", FTP=603, MAN=Murata, MANREF=GRM188R61H106KAALD, Part Number=CAP-000000025, SUPREF=81-GRM188R61H106KAALD
C6 C13: library part CAP-000000026, Value 1="220 nF", Value 2=50V, DES="Ceramic Capacitor, 220 nF, 50V, X7R, 0603", FTP=603, MAN=Murata, MANREF=GRM188R71H224KA93D, Part Number=CAP-000000026, SUPREF=81-GRM188R71H224KA93D
C7 C14 C101 C121: library part CAP-000000018, Value 1="1 µF", Value 2=50V, DES="Ceramic Capacitor, 1 µF, 50V, X5R, 0603", FTP=603, MAN=Murata, MANREF=GRM188R61H105KAALD, Part Number=CAP-000000018, SUPREF=81-GRM188R61H105KAALD
C10 C79: library part CAP-000000029, Value 1="47 µF", Value 2=6.3V, DES="Tantalum Capacitor, 47 µF, 6.3V, 1210", FTP=1210, MAN=KEMET, MANREF=T491D476K006AT, Part Number=CAP-000000029, SUPREF=581-T491D476K006AT
C16: library part CAP-000000059, Part Number=CAP-000000002, Value 1="10 uF", Value 2="50 VDC", DES="Multilayer Ceramic Capacitors MLCC - SMD/SMT RECOMMENDED ALT 810-C3225X7R1H106250", FTP=0603, MAN="Murata Electronics", MANREF=GRM188R61E106MA73D, NOTE=_, SUP=Mouser, SUPREF=81-GRM188R61E106MA3D, TOL="20 %"
C18 C32: library part CAP-000000063, Part Number=CAP-000000006, Value 1="10 nF", Value 2="50 VDC", DES="Multilayer Ceramic Capacitors MLCC - SMD/SMT 50V 0.01uF 0603 X7R 5%", FTP=0603, MAN=KEMET, MANREF=C0603C103J5RACTU, NOTE=_, SUP=Mouser, SUPREF=80-C0603C103J5R, TOL="5 %"
C22 C24 C75: library part CAP-000000062, Part Number=CAP-000000005, Value 1="1 uF", Value 2="50 VDC", DES="Multilayer Ceramic Capacitors MLCC - SMD/SMT 10v 1uF X5R 0603 10%", FTP=0603, MAN=KEMET, MANREF=C0603C105K8PACTU, NOTE=_, SUP=Mouser, SUPREF=80-C0603C105K8P, TOL="10 %"
C26: library part CAP-000000068, Part Number=CAP-000000011, Value 1="330 µF", Value 2=6.3V, DES="Tantalum Capacitor, 330 µF, 6.3V, 1210", FTP=1210, MAN=KEMET, MANREF=T491D337K006AT, SUPREF=581-T491D337K006AT
C34 C35: library part CAP-000000021, Value 1="4.7 µF", Value 2=50V, DES="Ceramic Capacitor, 4.7 µF, 50V, X5R, 0603", FTP=603, MAN=Murata, MANREF=GRM188R61H475KE11D, Part Number=CAP-000000021, SUPREF=81-GRM188R61H475KE11D
C39 C74: library part CAP-000000065, Part Number=CAP-000000008, Value 1="3.3 uF", FTP=0603
C41 C42 C84: library part CAP-000000013, Value 1="8.2 pF", Value 2=50V, DES="Ceramic Capacitor, 8.2 pF, 50V, C0G, 0402", FTP=402, MAN=Murata, MANREF=GRM1555C1H8R2CA01D, Part Number=CAP-000000013, SUPREF=81-GRM1555C1H8R2CA01D
C69 C70: library part CAP-000000030, Value 1="18 pF", Value 2=50V, DES="Ceramic Capacitor, 18 pF, 50V, C0G, 0603", FTP=603, MAN=Murata, MANREF=GRM1885C1H180JA01D, Part Number=CAP-000000030, SUPREF=81-GRM1885C1H180JA01D
C76 C77 C78 C93 C115: library part CAP-000000060, Part Number=CAP-000000003, Value 1="0.1 uF", Value 2="50 VDC", DES="Multilayer Ceramic Capacitors MLCC - SMD/SMT 50V 0.1uF 0603 X7R 20%", FTP=0603, MAN=KEMET, MANREF=C0603C104M5RAC, NOTE=_, SUP=Mouser, SUPREF=80-C0603C104M5RAC, TOL="20 %"
C81: library part CAP-000000028, Value 1="10 nF", Value 2=50V, DES="Ceramic Capacitor, 10 nF, 50V, X7R, 0603", FTP=603, MAN=Murata, MANREF=GRM188R71H103KA01D, Part Number=CAP-000000028, SUPREF=81-GRM188R71H103KA01D
C82: library part CAP-000000070, Part Number=CAP-000000015, Value 1="56 pF", Value 2=50V, DES="Ceramic Capacitor, 56 pF, 50V, C0G, 0402", FTP=402, MAN="KYOCERA AVX", MANREF=KGM05ACG1H560KH, SUPREF=581-KGM05ACG1H560KH
C83: library part CAP-000000069, Part Number=CAP-000000014, Value 1="15 pF", Value 2=50V, DES="Ceramic Capacitor, 15 pF, 50V, C0G, 0603", FTP=603, MAN=Murata, MANREF=GRM1885C1H150JA01D, SUPREF=81-GRM1885C1H150JA01D
C86 C87 C88 C89: library part CAP-000000012, Value 1="47 pF", Value 2=50V, DES="Ceramic Capacitor, 47 pF, 50V, C0G, 0402", FTP=402, MAN=KEMET, MANREF=C0402C470J5GAC, Part Number=CAP-000000012, SUPREF=80-C0402C470J5GAC
C90: library part CAP-000000033, Value 1="10 pF", Value 2=50V, FTP=603, Part Number=CAP-000000033
C91: library part CAP-000000032, Value 1="12 pF", Value 2=50V, FTP=603, Part Number=CAP-000000032
C94 C113: library part CAP-000000023, Value 1="22 nF", Value 2=50V, DES="Ceramic Capacitor, 22 nF, 50V, X7R, 0603", FTP=603, MAN=Murata, MANREF=GRM188R71H223KA01D, Part Number=CAP-000000023, SUPREF=81-GRM188R71H223KA01D
C99 C103 C105 C106 C110 C111 C119 C123 C125 C126 C130 C131: library part CAP-000000019, Value 1="4.7 nF", Value 2=50V, DES="Ceramic Capacitor, 4.7 nF, 50V, X7R, 0603", FTP=603, MAN=Murata, MANREF=GRM188R71H472KA01D, Part Number=CAP-000000019, SUPREF=81-GRM188R71H472KA01D
C100 C104 C112 C120 C124 C132: library part CAP-000000020, Value 1="1.5 nF", Value 2=50V, DES="Ceramic Capacitor, 1.5 nF, 50V, X7R, 0603", FTP=603, MAN=Murata, MANREF=GRM188R71H152KA01D, Part Number=CAP-000000020, SUPREF=81-GRM188R71H152KA01D
D1 D3 D4 D5 D6 D11 D12 D13 D14: library part TVS-000000009, Part Number=TVS-000000003, Value 1="12 V", Value 2="11 A", DES="ESD Protection Diodes / TVS Diodes Bidirectional Ultra Low Cap", FTP=SOD-323-2, MAN=Bourns, MANREF=CDSOD323-T12LC, NOTE=_, SUP=Mouser, SUPREF=652-CDSOD323-T12LC, TOL=_
D7: library part LED-000000008, Part Number=LED-000000003, Value 1=0.02A, Value 2="3.2 V", DES="Standard LEDs - SMD WL-SMCW SMDMono TpVw Waterclr 0603 Blue", FTP=0603, MAN="Wurth Elektronik", MANREF=150060BS75000, NOTE=_, SUP=Mouser, SUPREF=710-150060BS75000, TOL=_
D8: library part LED-000000006, Part Number=LED-000000001, Value 1=0.02A, Value 2="2 V", DES="Standard LEDs - SMD WL-SMCW SMDMono TpVw Waterclr 0603 Red", FTP=0603, MAN="Wurth Elektronik", MANREF=150060RS75000, NOTE=_, SUP=Mouser, SUPREF=710-150060RS75000, TOL=_
D9 D10: library part LED-000000007, Part Number=LED-000000002, Value 1=0.02A, Value 2="3.2 V", DES="Standard LEDs - SMD WL-SMCW SMDMono TpVw Waterclr 0603 Green", FTP=0603, MAN="Wurth Elektronik", MANREF=150060GS75000, NOTE=_, SUP=Mouser, SUPREF=710-150060GS75000, TOL=_
F1: library part FU-000000001, Value 1="3.15 A", Value 2="250 VAC", DES="Surface Mount Fuses UMZ 250 FUSE WITH HOLDER 3.15A T", FTP="11.1 mm x 4.2 mm", MAN=Schurter, MANREF=3404.2421.22, NOTE=_, Part Number=FU-000000001, SUP=Mouser, SUPREF=693-3404.2421.22, TOL="200 A at 250 VAC, 100 A at 125 VDC"
FB1 FB2 FB3 FB4 FB5 FB6 FB7 FB8: library part F-000000001, Value 1="120 Ohms", Value 2="2 A", DES="Ferrite Beads 120 OHM 25% Alternate Sizing Guide Below", FTP=F0603, MAN="Murata Electronics", MANREF=BLM18PG121SN1D, NOTE=_, Part Number=F-000000001, SUP=Mouser, SUPREF=81-BLM18PG121SN1D, TOL="25 %"
FID1 FID2 FID3: library part MIS-000000004, Part Number=MIS-000000003, Value 1=1mm, Value 2=_, DES=_, FTP=_, MAN=_, MANREF=_, NOTE=_, SUP=_, SUPREF=_, TOL=_
J1: library part CON-000000016, DES="SIMM Connectors PUSH-PUSH NANO SIM CONNECTOR", FTP=THT, MAN="TE Connectivity", MANREF=796644-2, Part Number=CON-000000016, SUP=Mouser, SUPREF=571-796644-2
J2: library part CON-000000013, Value 1=_, DES="Headers & Wire Housings WR-WTB 2.54mm Male 3Pin Lckg", FTP=THT, MAN="Wurth Elektronik", MANREF=61900311121, NOTE=_, Part Number=CON-000000013, SUP=Mouser, SUPREF=710-61900311121, TOL=_, Value 2=_
J3 J4: library part CON-000000011, Value 1=_, DES="Pluggable Terminal Blocks WR-TBL 300VAC 10A 3P Right Angle", FTP=THT, MAN="Wurth Elektronik", MANREF=691322310003, NOTE=_, Part Number=CON-000000011, SUP=Mouser, SUPREF=710-691322310003, TOL=_, Value 2=_
J5 J6 J7: library part CON-000000048, Part Number=CON-000000001, Value 1="1.1 mm", Value 2="500 mA", DES="Memory Card Connectors TFR READER (HINGE TYPE)", FTP=SMT, MAN=Molex, MANREF=47219-2001, NOTE=_, SUP=Mouser, SUPREF=538-47219-2001, TOL=_
J8: library part CON-000000010, Value 1=_, DES="Headers & Wire Housings WR-PHD 2.54mm 6Pin T HT Header", FTP=THT, MAN="Wurth Elektronik", MANREF=61300611121, NOTE=_, Part Number=CON-000000010, SUP=Mouser, SUPREF=710-61300611121, TOL=_, Value 2=_
J9: library part CON-000000014, DES="SMA Right-Angle Jack PCB THT Connector, 50Ω, 12.4GHz", FTP=THT, MAN="Amphenol RF", MANREF=132203-12, Part Number=CON-000000014, SUP=Mouser, SUPREF=523-132203-12
J10: library part CON-000000015, "4FF SIM, Push-Push Type, 7 Position, 7 Loaded Positions, Signal, -40  80 C [-40  185 F], SIM Card Connectors", Manufacturer_Name="TE Connectivity", Datasheet Link=https://www.te.com/en/product-2336582-1.html, DES="SIMM Connectors PUSH-PUSH NANO SIM CONNECTOR", FTP=SMT, Geometry.Height=1.62mm, MAN="TE Connectivity", MANREF=2336582-1, Manufacturer_Part_Number=2336582-1, Part Number=CON-000000015, SUP=Mouser, SUPREF=571-2336582-1
J11: library part CON-000000012, Value 1=_, DES="Coin Cell Battery Holders SMT HLDR-T&R-GLD CON FOR CR2032MFR", FTP=SMT, MAN=Renata, MANREF=SMTU2032-G.TR, NOTE=_, Part Number=CON-000000012, SUP=Mouser, SUPREF=614-SMTU2032-G.TR, TOL=_, Value 2=_
J12: library part CON-000000009, FTP=THT, MAN=Samtec, MANREF=CES-104-02-S-S, NOTE=_, Part Number=CON-000000009, SUP=Mouser, SUPREF=200-CES10402SS, TOL=_
J13: library part CON-000000054, Part Number=CON-000000008, Value 1=_, Value 2=10/100BaseT, DES="Modular Connectors / Ethernet Connectors WE-RJ45 Intgtd XFMR 1x2 THT Tab Down EMI", FTP=THT, MAN="Wurth Elektronik", MANREF=7499021125, NOTE=_, SUP=Mouser, SUPREF=710-7499021125, TOL=_
J14: library part CON-000000049, Part Number=CON-000000002, Value 1=_, Value 2=10/100/1000BaseT, DES="Modular Connectors / Ethernet Connectors WE-RJ45 Intgtd XFMR 1x1 THT Tab Down EMI", FTP=THT, MAN="Wurth Elektronik", MANREF=7499111121A, NOTE=_, SUP=Mouser, SUPREF=710-7499111121A, TOL=_
L1: library part IND-000000008, Part Number=IND-000000003, Value 1="4.7 µH", DES="Fixed Inductors 1.5uH Shld 20% 7.5A 23.6mOhms AECQ2", FTP=1616, MAN=Coilcraft, MANREF=XGL4030-472MEC, SUP=Mouser, SUPREF=994-XGL4030-472MEC
L2: library part IND-000000010, Part Number=IND-000000005, Value 1="6.8 µH", DES="Fixed Inductors 1.5uH Shld 20% 7.5A 23.6mOhms AECQ2", FTP=1616, MAN="TAIYO YUDEN", MANREF=NRS4018T6R8MDGJ, SUP=Mouser, SUPREF=963-NRS4018T6R8MDGJ
L3 L4 L5 L6 L7 L8: library part IND-000000011, Part Number=IND-000000006, DES="Common Mode Chokes / Filters 0603 33ohm 200mA", MAN=TDK, MANREF=MAF0603FAL330BT000, SUP=Mouser, SUPREF=810-MAF0603FAL330BT0
MH1 MH2 MH3 MH4: library part MIS-000000032, Part Number=MIS-000000004, Value 1=_, DES=_, MAN=_, MANREF=_, NOTE=_, TOL=_, Value 2=_
Q1 Q2 Q3: library part TRM-000000005, Part Number=TRM-000000002, Value 1="350 mA", Value 2=30V, DES="MOSFETs 30 V, 350 mA dual N-channel Trench MOSFET", FTP=TSSOP-6, MAN=Nexperia, MANREF=NX3008NBKS,115, NOTE=-, SUP=Mouser, SUPREF=771-NX3008NBKS,115, TOL=_
R1 R96 R97 R98 R99 R100 R113 R114 R115 R116 R127 R130 R131: library part RES-000000132, Part Number=RES-000000008, Value 1=330R, MAN="KOA Speer", NOTE=_, SUP=Mouser
R2 R10 R17 R18 R79 R102: library part RES-000000141, Part Number=RES-0000000017, Value 1="0 Ω", DES="Thick Film Resistor, 0 Ω (Jumper), 100 mW, 0603", FTP=0603, MAN="Stackpole Electronics", MANREF=RMCF0603ZT0R00, NOTE=_, SUP=Mouser, SUPREF=71-CRCW06030000Z0EA, TOL=1%
R4 R19 R20 R23 R24 R27 R28 R43 R58 R59 R67 R69 R91 R92 R93 R94 R101 R103 R105: library part RES-000000125, Part Number=RES-000000001, Value 1=1K, Value 2=0.63W, DES="Thin Film Resistors - SMD 1kOhm,0603,1%,25ppm, 63mW,50V", FTP=0603, MAN="KOA Speer", MANREF=RN731JTTD1001F25, NOTE=_, SUP=Mouser, SUPREF=660-RN731JTTD1001F25, TOL=1%
R5 R7 R8 R11 R13 R15 R112 R118 R126 R129: library part RES-000000126, Part Number=RES-000000002, Value 1=100K, Value 2=0.63W, DES="Thin Film Resistors - SMD 0603 100 Kohms 1% 10PPM", FTP=0603, MAN="KOA Speer", MANREF=RN731JTTD1003F100, NOTE=_, SUP=Mouser, SUPREF=660-RN731JTD1003F100, TOL=1%
R9: library part RES-000000140, Part Number=RES-0000000016, Value 1="35.7 kΩ", DES="Thick Film Resistor, 35.7 kΩ, 1%, 200 mW, 0603", FTP=0603, MAN=Panasonic, MANREF=ERJ-3EKF3572V, NOTE=_, SUP=Mouser, SUPREF=667-ERJ-3EKF3572V, TOL=1%
R16: library part RES-000000127, Part Number=RES-000000003, Value 1=24K9, Value 2=0.63W, DES="Thin Film Resistors - SMD 24.9kOhm,0603,1%,25p pm,63mW,50V", FTP=0603, MAN="KOA Speer", MANREF=RN731JTTD2492F25, NOTE=_, SUP=Mouser, SUPREF=660-RN731JTTD2492F25, TOL=1%
R21 R35: library part RES-000000130, Part Number=RES-000000006, Value 1=2K2, Value 2=0.1W, DES="Thin Film Resistors - SMD 2.2kOhm,0603,1%,25pp m,63mW,50V", FTP=0603, MAN="KOA Speer", MANREF=RN731JTTD2201F25, NOTE=_, SUP=Mouser, SUPREF=660-RN731JTTD2201F25, TOL=1%
R25 R26 R29 R30 R36 R41 R45 R50: library part RES-000000145, Part Number=RES-000000010, Value 1=4K7, FTP=0603, NOTE=_, SUP=Mouser
R32 R33 R34 R40 R44 R49 R52 R60 R68 R95 R104 R106 R117 R128: library part RES-000000131, Part Number=RES-000000007, Value 1=10K, Value 2=0.63W, DES="Thin Film Resistors - SMD 10kOhm,0603,1%,25ppm ,63mW,50V", FTP=0603, MAN="KOA Speer", MANREF=RN731JTTD1002F25, NOTE=_, SUP=Mouser, SUPREF=660-RN731JTTD1002F25, TOL=1%
R37 R39 R46 R48: library part RES-000000012, Value 1=56R, FTP=0603, NOTE=_, Part Number=RES-000000012, SUP=Mouser
R38 R47: library part RES-000000013, Value 1=120R, FTP=0603, NOTE=_, Part Number=RES-000000013, SUP=Mouser
R42 R81: library part RES-000000135, Part Number=RES-0000000011, Value 1="12 kΩ", DES="Thick Film Resistor, 12 kΩ, 1%, 200 mW, 0603", FTP=0603, MAN=Panasonic, MANREF=ERJ-3EKF1202V, NOTE=_, SUP=Mouser, SUPREF=667-ERJ-3EKF1202V, TOL=1%
R51 R53 R54 R55 R56 R57 R61 R62 R63 R64 R65 R66 R74 R75 R76 R77 R78 R80 R82 R84 R86 R87: library part RES-000000143, Part Number=RES-0000000019, Value 1="22 Ω", DES="Thick Film Resistor, 22 Ω, 1%, 200 mW, 0603", FTP=0603, MAN=Panasonic, MANREF=ERJ-3EKF22R0V, NOTE=_, SUP=Mouser, SUPREF=667-ERJ-3EKF22R0V, TOL=1%
R70 R89 R90: library part RES-000000136, Part Number=RES-0000000012, Value 1="10 kΩ", DES="Thin Film Resistor, 10 kΩ, 1%, 62.5 mW, 0603", FTP=0603, MAN="TE Connectivity", MANREF=CPF0603B10KE, NOTE=_, SUP=Mouser, SUPREF=279-CMF0603F1002FHEK, TOL=1%
R83 R88: library part RES-000000137, Part Number=RES-0000000013, Value 1="100 kΩ", DES="Thin Film Resistor, 100 kΩ, 1%, 125 mW, 0603", FTP=0603, MAN="Vishay / Dale", MANREF=TNPW0603100KBEA, NOTE=_, SUP=Mouser, SUPREF=71-CRCW0603100KFKEA, TOL=1%
R85: library part RES-000000011, Value 1=1M, FTP=0603, NOTE=_, Part Number=RES-000000011, SUP=Mouser
R107 R108 R109 R110 R111 R121 R122 R123 R124 R125: library part RES-000000134, Part Number=RES-0000000010, Value 1=49R9, NOTE=_, SUP=Mouser, TOL=1%
R119 R120 R132 R133: library part RES-000000128, Part Number=RES-000000004, Value 1=12K, Value 2=0.1W, DES="Thin Film Resistors - SMD 12kOhm,0603,1%,10ppm ,100mW,75V", FTP=0603, MAN="KOA Speer", MANREF=RN73H1JTTD1202F100, NOTE=_, SUP=Mouser, SUPREF=660-RN73H1JT1202F100, TOL=1%
S1: library part S-000000001, Value 1="50 mA", Value 2="24 VDC", DES="Tactile Switches R/A TACT 260 PB SWITCH", MAN="TE Connectivity / P&B", MANREF=1-1825027-2, NOTE=-, Part Number=S-000000001, SUP=Mouser, SUPREF=506-1-1825027-2
TP1 TP2 TP3 TP5 TP6 TP7 TP8 TP9 TP10 TP11 TP12 TP13 TP14 TP15 TP17 TP18 TP19 TP20 TP21 TP22 TP23 TP24 TP26 TP27 TP29 TP30 TP37 TP38 TP39 TP40 TP41 TP43 TP44 TP45 TP46 TP47 TP48 TP49 TP50 TP51 TP52 TP53 TP54 TP55 TP56 TP57 TP58 TP59 TP60 TP61 TP62 TP63 TP64 TP65 TP66 TP67 TP68 TP69: library part MIS-000000003, Part Number=MIS-000000002, Value 1=_, DES=_, FTP=_, MAN=_, MANREF=_, NOTE=_, SUP=_, SUPREF=_, TOL=_, Value 2=_
U1 U2: library part VRG-000000022, Part Number=VRG-000000003, Value 1="1 V to 24 V", Value 2="4 A", DES="Bridge Rectifiers 1000V 1A", FTP=621-DF10M, MAN="Texas Instruments", MANREF=LMR33640DDDAR, NOTE=-, SUP=Mouser, SUPREF=595-LMR33640DDDAR, TOL=_
U3: library part VRG-000000020, Part Number=VRG-000000001, Value 1=3.3V, Value 2=1A, DES="TEXAS INSTRUMENTS  TLV1117LV33DCYR  LDO FIXE 3.3V 1A SOT-223-4", FTP=SOT-223, MAN="Texas Instrument", MANREF=TLV1117LV33DCYR, NOTE=-, SUP=Farnell, SUPREF=2323647, TOL=_
U4: library part MIS-000000006, NOTE=_, Part Number=MIS-000000006
U5 U6 U7 U20: library part GIC-000000009, "Dual Buffer/Driver with Open-Drain Output", Manufacturer_Name="Texas Instruments", Mouser Part Number=595-SN74LVC2G07DCKT, Value 1="5.5 V", Value 2="32 mA", Datasheet Link=http://www.ti.com/lit/gpn/SN74LVC2G07, DES="Buffers & Line Drivers Dual Buffer Driver A 595-SN74LVC2G07DCKR", FTP=SOT-353-SC70-6, Geometry.Height=1.1mm, MAN="Texas Instruments", MANREF=SN74LVC2G07DCKT, Manufacturer_Part_Number=SN74LVC2G07DCKT, Mouser Price/Stock=https://www.mouser.co.uk/ProductDetail/Texas-Instruments/SN74LVC2G07DCKT?qs=pajgIaoyDUh%252B8BjKWdvxSw%3D%3D, NOTE=_, Part Number=GIC-000000009, SUP=Mouser, SUPREF=595-SN74LVC2G07DCKT, TOL=_
U8: library part GIC-000000012, Value 1=_, DES="EEPROM 64x16", FTP=SOIC-8, MAN="Microchip Technology", MANREF=93C46B-I/SN, NOTE=_, Part Number=GIC-000000012, SUP=Mouser, SUPREF=579-93C46B-I/SN, TOL=_, Value 2=_
U9: library part GIC-000000005, Value 1="3.3 V", Value 2="70 mA", DES="USB Interface IC USB HS to Dual UART/ FIFO/SPI/JTAG/I2C", FTP=LQFP-64, MAN=FTDI, MANREF=FT2232HL-REEL, NOTE=_, Part Number=GIC-000000005, SUP=Mouser, SUPREF=895-FT2232HL, TOL=_
U10 U11: library part GIC-000000013, DES="RS-422/RS-485 Interface IC Differential Bus Tra ns A 595-SN75176AD", FTP=SOIC-8, MAN="Texas Instruments", MANREF=SN75176ADR, NOTE=_, Part Number=GIC-000000013, SUP=Mouser, SUPREF=595-SN75176ADR, TOL=_
U12: library part GIC-000000016, Part Number=GIC-000000001, Value 1="5.5 V", Value 2="10 uA", DES="Analogue Switch ICs Triple DPDT, Low-Capacitance Data Switches", FTP=TQFN-24, MAN="Maxim Integrated", MANREF="MAX4996LETG+ / MAX4996LETG+", NOTE=_, SUP=Mouser, SUPREF=700-MAX4996LETG, TOL=_
U13 U14 U16: library part ICP-000000002, Value 1="1.5 A", Value 2="1.6 V to 5.5 V", DES="Power Switch ICs - Power Distribution 5.5-V 1.5-A 90-moh m load switch with a A 595-TPS22919DCKT", FTP=SC70-6, MAN="Texas Instruments", MANREF=TPS22919DCKR, NOTE=-, Part Number=ICP-000000002, SUP=Mouser, SUPREF=595-TPS22919DCKR, TOL=_
U15: library part GIC-000000008, Value 1="5.5 V", Value 2="32 mA", DES="Buffers & Line Drivers Single Gate Open Out 1.65 to 5.5V 32mA", FTP=SOT-353, MAN="Diodes Incorporated", MANREF=74LVC1G07SE-7, NOTE=_, Part Number=GIC-000000008, SUP=Mouser, SUPREF=621-74LVC1G07SE-7, TOL=_
U17: library part GIC-000000017, Part Number=GIC-000000002, Value 1="3.3 V", Value 2="70 mA", DES="USB Interface IC 4-Port USB 2.0 Hi-Speed Hub Cont", FTP=SQFN-36, MAN="Microchip Technology", MANREF=USB2514B/M2, NOTE=_, SUP=Mouser, SUPREF=579-USB2514B/M2, TOL=_
U18: library part GIC-000000011, Value 1="3.6 V", Value 2=_, DES="EEPROM 1.7-3.6V, 1MHz, Ind Tmp, 8-TSSOP", FTP=TSSOP-8, MAN="Microchip Technology", MANREF=AT24C04D-XHM-B, NOTE=_, Part Number=GIC-000000011, SUP=Mouser, SUPREF=556-AT24C04D-XHM-B, TOL=_
U19: library part MCU-000000003, Part Number=MCU-000000002, Value 1=_, DES="8-bit Microcontrollers - MCU 8-Bit MCU 56KB Flash 4KB RAM 256B EE CIP", FTP=SSOP-28, MAN="Microchip Technology", MANREF=PIC16F18857T-I/SS, NOTE=_, SUP=Mouser, SUPREF=579-PIC16F18857TI/SS, TOL=_, Value 2=_
U21: library part GIC-000000015, DES="Mobile Modules LTE/3G/GSM-Global-Data only B1,2,3,4,5,7,8,12,13,18,19,20,26,28 LGA, 24x26 mm, 150 pcs/ree", MAN=u-blox, MANREF=LARA-R6001D-00B, NOTE=_, Part Number=GIC-000000015, SUP=Mouser, SUPREF=377-LARA-R6001D-00B, TOL=_
U22: library part GIC-000000014, "Real Time Clock I2C GP RTCC 64B SRAM, EXT", DES="Real Time Clock I2C GP RTCC 64B SRAM, EXT", FTP=MSOP-8, MAN="Microchip Technology", MANREF=MCP7940NT-E/MS, NOTE=_, Part Number=GIC-000000014, SUP=Mouser, SUPREF=579-MCP7940NT-E/MS, TOL=_
U23 U28: library part GIC-000000010, Value 1="3.3 V", Value 2="480 Mb/s", DES="USB Interface IC Hi-Speed USB 2.0 10/100/1000 Ethernet", FTP=QFN-56, MAN="Microchip Technology", MANREF=LAN9500A-ABZJ-TR, NOTE=_, Part Number=GIC-000000010, SUP=Mouser, SUPREF=886-LAN9500A-ABZJ-TR, TOL=_
U24 U25 U26 U27: library part TVS-000000007, Part Number=TVS-000000001, Value 1="7 V", Value 2="0.05 pF", DES="ESD Suppressors / TVS Diodes 4Ch ESD SOLUTION", FTP=USON-10, MAN="Texas Instruments", MANREF=TPD4EUSB30DQAR, NOTE=_, SUP=Mouser, SUPREF=595-TPD4EUSB30DQAR, TOL=_
U29: library part DIB-000000003, Part Number=VRG-000000002, Value 1="1 kV", Value 2=1A, DES="Bridge Rectifiers 1000V 1A", FTP=621-DF10M, MAN="Diodes Incorporated", MANREF=DF10M, NOTE=-, SUP=Mouser, SUPREF=621-DF10M, TOL=_
Y1: library part Y-000000008, Part Number=Y-000000002, Value 1=12Mhz, DES="Crystals CRYSTAL 12MHZ 8PF SMD", FTP=_, MAN=NDK, MANREF=NX3225SA-12MHZ-STD-CSR-6, NOTE=_, SUP=Mouser, SUPREF=344-NX3225SA12MCSR6
Y2: library part Y-000000003, Value 1="24 MHz", Value 2="27 pF", DES="Crystals Crystal Ceramic SEAM3225 T&R 3K", MAN="Diodes Incorporated", MANREF=FL2400155, NOTE=_, Part Number=Y-000000003, SUP=Mouser, SUPREF=729-FL2400155, TOL="30 PPM"
Y3: library part Y-000000006, Value 1=32.768kHz, Value 2=12pF, DES="Crystals Xtal 3.2X1.5, 12.5pF, 32.768kHz", MAN=Vishay, MANREF=XT1312HHRXX32K76E, NOTE=_, Part Number=Y-000000006, SUP=Mouser, SUPREF=70-XT1312HHRXX32K76E, TOL="30 PPM"
Y4 Y5: library part Y-000000007, Part Number=Y-000000001, Value 1="40 pF", Value 2="25 MHz", DES="Standard Clock Oscillators MEMS Oscillator Low PWR LVCMOS -20C-70C", FTP=CDFN-4, MAN="Microchip Technology", MANREF=DSC1001CE5-025.0000T, NOTE=_, SUP=Mouser, SUPREF=579-001CE50250000T, TOL="10 PPM"

## Via types
v1: diameter 8/8/8/8/8/8/8/8 (per signal layer), hole 5, Signal 1 to Signal 4, 822 vias
v2: diameter 8, hole 5, Signal 1 to Signal 4, tented both sides, 310 vias
v3: diameter 50, hole 28, Signal 1 to Signal 4, tented both sides, 10 vias
v4: diameter 8/8/8/8/8/8/8/8 (per signal layer), hole 5, Signal 1 to Signal 4, tented both sides, 9 vias
v5: diameter 8, hole 5, Signal 1 to Signal 4, 4 vias
v6: diameter 50, hole 5, Signal 1 to Signal 4, tented both sides, 1 vias

## Nets (pads, with @x,y where several pads share a name; then routed paths per layer and width w, separated by ;. In a path a pad name is that pad's centre, name@x,y a point inside that pad or via, vN(x,y) a via of type N, cw(c..) or ccw(c..) an arc to the next point about the centre after c; other vN are vias at no path point)
1V8: C39.2 C44.2 C45.2 C46.2 TP18.1 U9.12 U9.37 U9.49 U9.64 | length 462.2
  Signal 1 w5: TP18.1@3877.33,2036.05 3877.64,2036.05 3914.07,1999.62 v2(3914.37,1999.62) ; C46.2@3984.62,2150.22 3984.62,2145.91 v2(4022.64,2107.89) 4022.64,2107.23 4052.78,2077.09 U9.64@4052.78,2076.43 ; C44.2@4132.87,1751.24 4136.17,1751.24 v2(4176.77,1791.83) 4176.77,1792.21 4205.89,1821.33 U9.12@4205.89,1821.71 ; C39.2@4192.91,2355.72 4192.91,2354.94 v2(4231.3,2316.55) 4231.3,2316.02 4261.57,2285.75 U9.49@4261.57,2285.22 ; U9.37@4516.29,2132.11 4516.81,2132.11 4548.69,2163.99 v2(4549.21,2163.99) 4589.32,2204.1 C45.2@4589.32,2207.68
3v3: C33.2 C38.2 C47.2 C48.2 C49.2 C50.2 C51.1 C54.1 C57.1 C60.1 C62.2 C63.2 C64.2 C65.2 C66.2 C67.2 C73.2 C74.2 C75.2 C76.2 C77.2 C93.2 C96.2 C107.2 C108.2 C109.2 C110.2 C111.2 C112.2 C116.2 C127.2 C128.2 C129.2 C130.2 C131.2 C132.2 FB1.1 FB2.1 FB5.1 FB8.1 J8.2 J12.2 R17.2 R18.1 R25.2 R26.2 R32.2 R33.2 R34.2 R70.2 R83.1 R89.1 R90.1 R96.1 R97.2 R98.1 R99.1 R100.1 R112.2 R113.2 R114.2 R115.2 R116.2 R118.2 R126.2 R127.2 R129.2 R130.2 R131.2 TP68.1 U8.8 U9.20 U9.31 U9.42 U9.50 U9.56 U12.14 U13.1 U14.1 U16.1 U17.5 U17.10 U17.15 U17.23 U17.27 U17.29 U17.36 U18.8 U19.20 U20.5 U23.25 U23.35 U23.36 U23.38 U23.39 U23.40 U23.48 U23.49 U23.51 U23.52 U28.25 U28.35 U28.36 U28.38 U28.39 U28.40 U28.48 U28.49 U28.51 U28.52 Y4.4 Y5.4 | length 8757.6